# Altium PCB PCB1.PcbDoc (part 3 of 3)
Units mm, origin at the board's own origin, x right, y up, seen from the top; angles counter-clockwise.
Board outline 115 x 52 mm, 2 copper layers (Top Layer, Bottom Layer); 184 components, 116 nets, 555 pads, 115 vias.
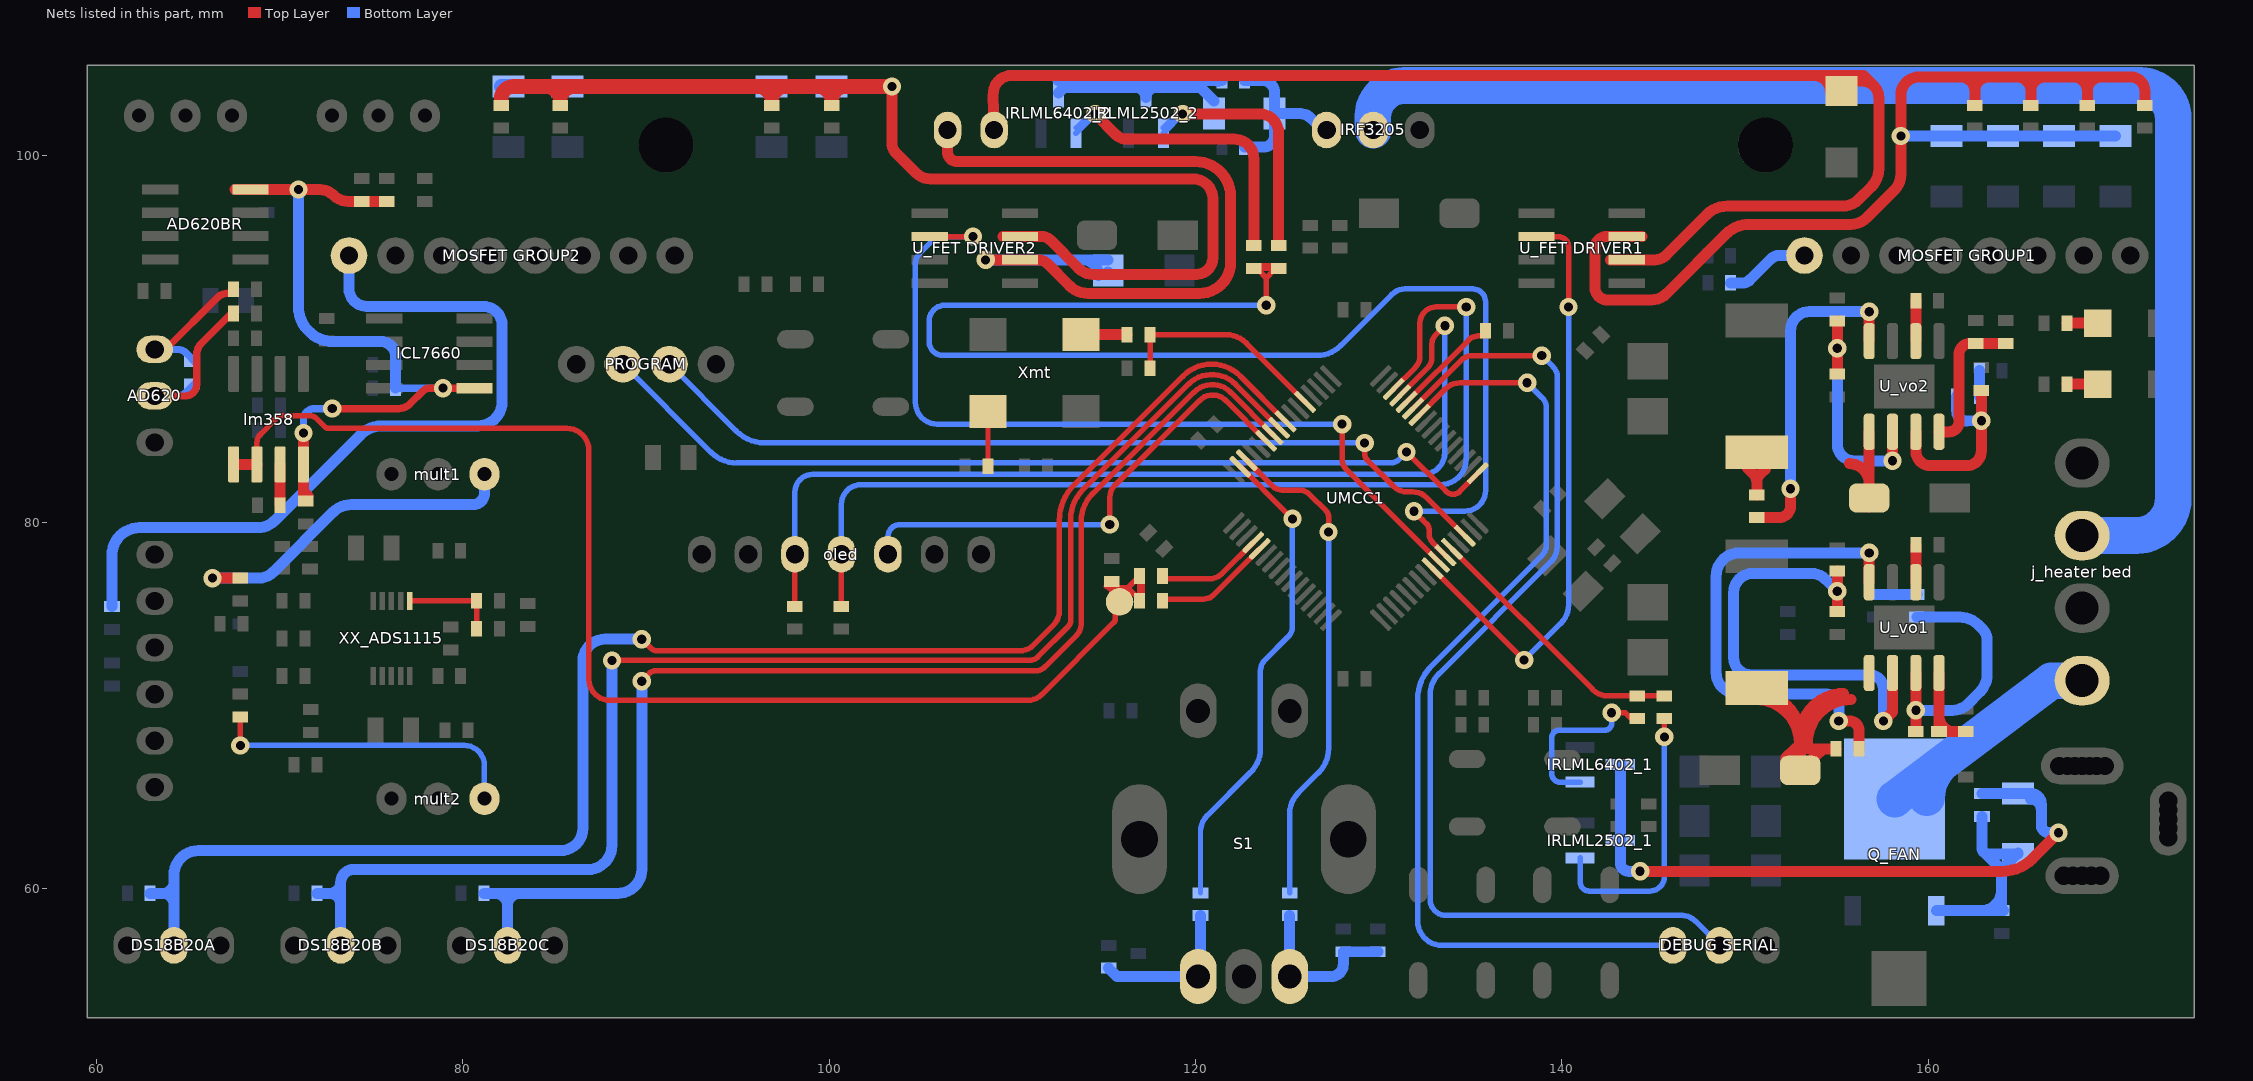
[diagram p3: the nets of this part, all layers, seen from the top]

## Via types
v1: diameter 1, hole 0.5, Top Layer to Bottom Layer, 115 vias

## Nets (pads, with @x,y where several pads share a name; then routed paths per layer and width w, separated by ;. In a path a pad name is that pad's centre, name@x,y a point inside that pad or via, vN(x,y) a via of type N, cw(c..) or ccw(c..) an arc to the next point about the centre after c; other vN are vias at no path point) (continued)
NetC_reg1_1: C_reg1.1 C_reg2.1 U_vo1.3 | length 14.5
  Top Layer w0.6: C_reg2.1@159.315,68.576 U_vo1.3@159.315,71.78
  Bottom Layer w0.6: v1(159.32,69.74) 161.323,69.74 ccw(c161.323,70.937) 162.169,70.09 ; C_reg1.1@159.37,74.828 161.721,74.828 cw(c161.721,73.425) 162.713,74.417 162.961,74.169 cw(c162.362,73.569) 163.21,73.569 163.21,71.7 cw(c161.837,71.7) 162.808,70.729 162.17,70.09
NetC_reg1_2: C_reg1.2 Rreg1.1 | length 2.3
  Bottom Layer w0.6: Rreg1.1@157.07,76.072 C_reg1.2@159.37,76.072
NetC_regl_1: C_regl.1 C_regp1.1 U_vo2.3 | length 11.3
  Top Layer w0.6: U_vo2.3@159.315,84.945 159.315,83.895 ccw(c160.11,83.895) 160.11,83.1 162.1,83.1 ccw(c162.1,83.899) 162.899,83.899 v1(162.899,85.548) C_regl.1@162.899,87.198
  Bottom Layer w0.6: C_regp1.1@161.538,86.88 161.546,86.1 ccw(c162.106,86.1) 162.119,85.54 v1(162.899,85.548)
NetC_regp1_2: C_regp1.2 Rregp5.1 | length 1.4
  Bottom Layer w0.6: C_regp1.2@162.782,86.88 Rregp5.1@162.782,88.28
NetC_reguulator1_1: C_reguulator1.1 DPND1.2 L_pp.1 U_vo1.1 | length 22.2
  Top Layer w0.6: L_pp.1@150.589,70.323 cw(c150.589,67.953) 152.959,67.953 ; L_pp.1@150.64,70.66 cw(c150.64,68.29) 153.01,68.29 ; DPND1.2@152.21,66.72 152.222,67.163 152.286,67.224 153.01,67.91 ; 153.401,67.953 cw(c155.771,67.953) 155.771,70.323 ; C_reguulator1.1@154.969,67.638 154.253,67.638 ; 155.38,70.66 ccw(c155.38,68.29) 153.01,68.29 ; 153.01,67.91 153.01,68.166 ; 153.01,67.91 DPND1.2@153.01,66.46 154.253,67.638 ; 153.01,68.166 ccw(c153.538,68.166) 153.538,67.638 154.253,67.638 ; 153.01,68.166 153.01,68.29
NetC_reguulator1_2: C_reguulator1.2 U_vo1.8 | length 26.9
  Top Layer w0.6: v1(155.113,69.153) 155.707,69.153 cw(c155.707,68.647) 156.213,68.647 C_reguulator1.2@156.213,67.638 ; U_vo1.8@156.775,76.73 v1(156.775,78.335)
  Bottom Layer w0.6: v1(155.113,69.153) 155.113,69.887 ccw(c154.36,69.887) 154.36,70.64 149.59,70.64 cw(c149.59,71.818) 148.412,71.818 148.412,77.052 cw(c149.695,77.052) 149.695,78.335 v1(156.775,78.335)
NetC_reguulatorm_1: C_reguulatorm.1 DPNDd.2 L_ppb.1 U_vo2.1 | length 8.9
  Top Layer w0.6: L_ppb.1@149.781,83.311 150.058,83.2 ccw(c150.458,83.2) 150.173,82.919 150.465,82.627 cw(c150.04,82.203) 150.64,82.203 ; C_reguulatorm.1@150.64,81.503 150.64,82.203 ; L_ppb.1@151.107,82.919 150.815,82.627 ccw(c151.24,82.203) 150.64,82.203 ; 155.69,83.2 cw(c155.69,82.115) DPNDd.2@156.775,82.115 ; DPNDd.2@156.775,80.83 DPNDd.2@156.775,82.115 ; U_vo2.1@156.775,84.945 DPNDd.2@156.775,82.115
NetC_reguulatorm_2: C_reguulatorm.2 U_vo2.8 | length 18.3
  Top Layer w0.6: C_reguulatorm.2@150.64,80.258 151.838,80.258 ccw(c151.838,80.9) 152.48,80.9 v1(152.48,81.83) ; U_vo2.8@156.775,89.895 v1(156.775,91.5)
  Bottom Layer w0.6: v1(152.48,81.83) 152.48,90.47 cw(c153.51,90.47) 153.51,91.5 v1(156.775,91.5)
NetCT1_1: CT1.1 R_PL1.2 R_PL2.1 S1.A | length 8.5
  Bottom Layer w0.6: CT1.1@115.25,55.661 115.701,55.21 R_PL1.2@116.88,55.21 S1.A@120.14,55.21 120.27,55.34 R_PL2.1@120.27,58.536
NetCT2_2: CT2.2 R_PL3.1 R_PL4.2 S1.B | length 9.2
  Bottom Layer w0.6: R_PL3.1@125.14,58.536 S1.B@125.14,55.21 127.395,55.21 ccw(c127.395,55.885) 128.07,55.885 R_PL4.2@128.07,56.56 CT2.2@129.95,56.56
NetD_GATE1_2: "U_FET DRIVER1.7" D_GATE1.2 D_GATE2.2 D_GATE3.2 D_GATE4.2 R_gate1.2 R_gate2.2 R_gate3.2 R_gate4.2 | length 65.6
  Top Layer w0.6: 144.38,95.6 143.534,95.6 142.44,95.6 ccw(c142.44,94.96) 141.8,94.96 141.8,92.83 ccw(c142.49,92.83) 142.49,92.14 144.878,92.14 ccw(c144.878,93.303) 145.701,92.481 148.95,95.73 ; 148.95,95.73 cw(c150.254,94.425) 150.254,96.27 155.79,96.27 ccw(c155.79,97.453) 156.626,96.616 158.143,98.133 ccw(c157.282,98.995) 158.5,98.995 v1(158.5,101.09) 158.5,103.32 cw(c159.49,103.32) 159.49,104.31 161.78,104.31 ; R_gate4.2@162.539,102.762 162.539,103.551 ; 163.357,104.31 164.843,104.31 ; R_gate3.2@165.602,102.762 165.602,103.551 ; 166.43,104.31 167.927,104.31 ; R_gate2.2@168.685,102.762 168.685,103.551 ; R_gate1.2@171.819,102.762 171.819,103.551 ccw(c171.06,103.551) 171.06,104.31 169.444,104.31 ; 161.78,104.31 cw(c161.78,103.551) 162.539,103.551 ; 161.78,104.31 163.297,104.31 ccw(c163.297,103.551) 162.539,103.551 ; 164.843,104.31 cw(c164.843,103.551) 165.602,103.551 ; 164.843,104.31 166.36,104.31 ccw(c166.36,103.551) 165.602,103.551 ; 167.927,104.31 cw(c167.927,103.551) 168.685,103.551 ; 167.927,104.31 169.444,104.31 ; 168.685,103.551 cw(c169.444,103.551) 169.444,104.31
  Bottom Layer w0.6: v1(158.5,101.09) D_GATE4.2@160.999,101.09 D_GATE3.2@164.072,101.09 D_GATE2.2@167.145,101.09 D_GATE1.2@170.219,101.09
NetD_GATE5_2: "U_FET DRIVER2.7" D_GATE5.2 D_GATE6.2 D_GATE7.2 D_GATE8.2 R_gate5.2 R_gate6.2 R_gate7.2 R_gate8.2 | length 94
  Top Layer w0.6: 84.282,103.79 cw(c84.282,102.762) R_gate7.2@85.31,102.762 ; 85.27,103.79 cw(c85.27,103.75) 85.31,103.75 R_gate7.2@85.31,102.762 ; 86.338,103.79 ccw(c86.338,102.762) R_gate7.2@85.31,102.762 ; 95.832,103.79 cw(c95.832,102.762) R_gate6.2@96.86,102.762 ; 96.82,103.79 cw(c96.82,103.75) 96.86,103.75 R_gate6.2@96.86,102.762 ; 97.888,103.79 ccw(c97.888,102.762) R_gate6.2@96.86,102.762 ; 99.102,103.79 cw(c99.102,102.762) R_gate5.2@100.13,102.762 ; 100.09,103.79 cw(c100.09,103.75) 100.13,103.75 R_gate5.2@100.13,102.762 ; 101.158,103.79 ccw(c101.158,102.762) R_gate5.2@100.13,102.762 ; v1(103.43,103.79) 103.43,100.684 ccw(c104.164,100.684) 103.645,100.165 104.73,99.08 ccw(c105.526,99.875) 105.526,98.75 119.87,98.75 cw(c119.87,97.68) 120.94,97.68 120.94,94.42 cw(c120.06,94.42) 120.06,93.54 114.389,93.54 cw(c114.389,94.624) 113.623,93.857 112.073,95.407 ccw(c111.607,94.941) 111.607,95.6 110.414,95.6 109.5,95.6
  Top Layer w0.8: 82.09,103.12 cw(c82.76,103.12) 82.76,103.79 84.282,103.79 85.27,103.79 86.338,103.79 95.832,103.79 96.82,103.79 97.888,103.79 99.102,103.79 100.09,103.79 101.158,103.79 v1(103.43,103.79)
  Bottom Layer w0.8: D_GATE8.2@82.09,103.79 D_GATE6.2@96.86,103.79 D_GATE5.2@100.13,103.79 v1(103.43,103.79)
NetD_GATEF_1: D_GATEF.1 Q_FAN.1 R_gateF.1 R_gateHJF.1 | length 15.4
  Bottom Layer w0.6: Q_FAN.1@160.44,58.8 162.88,58.8 ccw(c162.88,59.92) 164,59.92 ; 161.66,58.8 R_gateF.1@164.1,58.8 ; R_gateHJF.1@162.93,63.956 162.93,62.23 ccw(c163.26,62.23) 163.097,61.943 ; 163.01,62.03 163.097,61.943 ; R_gateF.1@164,58.8 164,59.92 ; D_GATEF.1@164.9,61.9 163.26,61.9 cw(c163.26,62.23) 163.097,61.943 ; D_GATEF.1@164.903,61.943 164,61.04 ; 163.097,61.943 164,61.04 ; 164,59.92 164,61.04
NetD_GATEF_2: D_GATEF.2 IRLML2502_1.3 IRLML6402_1.3 R_gateHJF.2 | length 36.8
  Top Layer w0.6: v1@144.64,60.95 164.023,60.95 ccw(c164.023,63.308) 165.691,61.641 v1(167.11,63.06)
  Bottom Layer w0.6: IRLML6402_1.3@143.19,66.77 IRLML2502_1.3@143.19,62.63 143.19,61.42 ccw(c143.66,61.42) 143.66,60.95 v1(144.27,60.95) ; R_gateHJF.2@162.93,65.2 D_GATEF.2@164.9,65.2 165.58,65.2 cw(c165.58,64.61) 166.17,64.61 166.17,63.47 ccw(c166.58,63.47) 166.58,63.06 v1(167.11,63.06) ; D_GATEF.2@165.579,64.897 cw(c165.579,64.307) 166.169,64.307
NetD_GATEH_1: D_GATEH.1 IRF3205.1 R_gateHJ.1 R_gateHP.1 | length 9.5
  Bottom Layer w0.6: R_gateHP.1@122.682,100.49 123.71,100.49 ccw(c123.71,101.09) 124.31,101.09 D_GATEH.1@124.31,102.308 ; R_gateHJ.1@122.682,104.12 123.66,104.12 cw(c123.66,103.47) 124.31,103.47 D_GATEH.1@124.31,102.308 ; IRF3205.1@127.16,101.418 126.932,101.418 126.265,102.085 ccw(c125.727,101.547) 125.727,102.308 D_GATEH.1@124.31,102.308
NetD_GATEH_2: D_GATEH.2 IRLML2502_2.3 IRLML6402_2.3 R_gateHJ.2 | length 19.8
  Bottom Layer w0.6: IRLML6402_2.3@112.5,104.12 R_gateHJ.2@121.378,104.12 ; IRLML6402_2.3@112.52,103.44 112.82,103.74 120.27,103.74 D_GATEH.2@121,103.01 ; 116.73,103.74 cw(c116.73,103.18) 117.29,103.18 cw(c117.85,103.18) 117.85,103.74 ; R_gateHJ.2@121.223,104.065 cw(c121.655,103.092) R_gateHJ.2@121.37,104.118 ; R_gateHJ.2@121.37,104.118 cw(c121.438,103.055) R_gateHJ.2@121.438,104.12 R_gateHJ.2@121.378,104.12 ; R_gateHJ.2@121.37,104.118 cw(c121.655,103.092) R_gateHJ.2@121.378,104.12
NetIRF3205_2: "j_heater bed.2" IRF3205.2 | length 73.3
  Bottom Layer w2: IRF3205.2@129.7,101.418 129.676,101.934 cw(c131.425,102.094) 131.421,103.85 171.56,103.85 cw(c171.56,102.04) 173.37,102.04 173.37,81.3 cw(c171.35,81.3) 171.35,79.28 168.4,79.28
NetIRLML2502_1_1: IRLML2502_1.1 RPL.2 | length 14.9
  Top Layer w0.3: v1(145.59,68.29) RPL.2@145.59,69.286
  Bottom Layer w0.3: IRLML2502_1.1@140.99,61.68 140.99,60.38 ccw(c141.5,60.38) 141.5,59.87 144.799,59.87 ccw(c144.799,60.661) 145.59,60.661 v1@145.59,67.95
NetIRLML2502_2_1: IRLML2502_2.1 RPS_H2.2 | length 15
  Top Layer w0.6: v1(119.294,102.294) 123.511,102.294 cw(c123.511,101.276) 124.53,101.276 RPS_H2.2@124.53,95.114
  Bottom Layer w0.3: IRLML2502_2.1@118.236,101.528 v1@119.29,102.582 ; IRLML2502_2.1@118.24,101.24 v1(119.294,102.294)
NetIRLML6402_1_1: IRLML6402_1.1 RPS.2 | length 9.6
  Top Layer w0.3: v1(142.714,69.61) 143.45,69.61 143.774,69.286 RPS.2@144.11,69.286
  Bottom Layer w0.3: IRLML6402_1.1@140.99,65.82 139.91,65.82 cw(c139.91,66.28) 139.45,66.28 139.45,68.26 cw(c139.84,68.26) 139.84,68.65 142.34,68.65 ccw(c142.34,69.024) 142.714,69.024 v1(142.714,69.61)
NetIRLML6402_2_1: IRLML6402_2.1 RPS_H1.2 | length 17.5
  Top Layer w0.6: v1(114.524,102.294) 115.664,101.155 ccw(c116.231,101.722) 116.231,100.92 122.104,100.92 cw(c122.104,99.836) 123.188,99.836 RPS_H1.2@123.188,95.114
  Bottom Layer w0.3: IRLML6402_2.1@113.47,101.24 v1(114.524,102.294) ; IRLML6402_2.1@113.499,101.528 v1@114.553,102.582
"Netj_heater bed_4": "j_heater bed.4" Q_FAN.4 | length 14.4
  Bottom Layer w2: Q_FAN.4@158.16,64.9 166.72,71.36 168.4,71.36 ; Q_FAN.4@159.916,64.974 cw(c162.456,64.974) Q_FAN.4@160.66,66.77
NetLED_1P_1: LED_1P.1 RPSn2.1 | length 1.7
  Top Layer w0.6: RPSn2.1@167.56,87.55 LED_1P.1@169.24,87.55
NetLED_2P_1: LED_2P.1 RPSn1.1 | length 1.7
  Top Layer w0.6: RPSn1.1@167.56,90.88 LED_2P.1@169.24,90.88
Netlm358_3: lm358.3 RP3.1 | length 2.2
  Top Layer w0.6: RP3.1@70.03,80.935 lm358.3@70.03,83.16
Netmult1_1: mult1.1 RTW3.1 | length 19.3
  Top Layer w0.6: v1(66.34,76.955) RTW3.1@67.86,76.955
  Bottom Layer w0.6: v1(66.34,76.955) 68.85,76.955 ccw(c68.85,78.103) 69.661,77.291 72.925,80.555 cw(c73.927,79.553) 73.927,80.97 80.56,80.97 ccw(c80.56,81.594) 81.184,81.594 mult1.1@81.184,82.63
Netmult2_1: mult2.1 RTW6.1 | length 17.3
  Top Layer w0.3: v1(67.86,67.82) RTW6.1@67.86,69.38
  Bottom Layer w0.3: v1(67.86,67.82) 80.08,67.82 cw(c80.08,66.716) 81.184,66.716 mult2.1@81.184,64.92
NetR_ADC_JUMP1_2: R_ADC_JUMP1.2 UMCC1.20 | length 5.8
  Top Layer w0.3: R_ADC_JUMP1.2@118.19,77.07 ccw(c118.34,77.07) 118.34,76.92 120.768,76.92 ccw(c120.768,77.871) 121.44,77.199 UMCC1.20@123.149,78.907
NetR_ADC_JUMP2_2: R_ADC_JUMP2.2 UMCC1.21 | length 6.5
  Top Layer w0.3: R_ADC_JUMP2.2@118.19,75.71 cw(c118.29,75.71) 118.29,75.81 120.43,75.81 ccw(c120.43,76.604) 120.991,76.042 UMCC1.21@123.502,78.553
NetR_ADDR1_2: R_ADDR1.2 R_ADDR2.2 XX_ADS1115.1 | length 5.1
  Top Layer w0.3: XX_ADS1115.1@77.104,75.711 R_ADDR1.2@80.75,75.711 R_ADDR2.2@80.75,74.28
NetR_BOOT_1: R_BOOT.1 UMCC1.60 | length 5.9
  Top Layer w0.3: UMCC1.60@131.521,86.572 134.914,89.966 cw(c135.432,89.448) 135.432,90.18 R_BOOT.1@135.95,90.18
NetR_feedaback2_1: R_feedaback2.1 R_feeedback1.2 U_vo1.4 | length 8.3
  Top Layer w0.6: R_feeedback1.2@162.04,68.576 161.409,68.576 ; 161.409,68.576 cw(c161.409,69.4) 160.585,69.4 U_vo1.4@160.585,71.78 R_feedaback2.1@160.585,68.576 161.409,68.576
NetR_feedabacko_1: R_feedabacko.1 R_feeedbackv.2 U_vo2.4 | length 8
  Top Layer w0.6: U_vo2.4@160.585,84.945 161.132,84.945 ccw(c161.132,85.492) 161.68,85.492 161.68,89.16 cw(c162.291,89.16) 162.291,89.771 R_feedabacko.1@162.599,89.771 R_feeedbackv.2@164.229,89.771
NetR_XT1_2: R_XT1.2 Xmt.1 | length 3
  Top Layer w0.3: R_XT1.2@108.67,83.06 Xmt.1@108.67,86.059
NetR_XT2_1: R_XT2.1 Xmt.3 | length 2.5
  Top Layer w0.6: Xmt.3@113.75,90.25 R_XT2.1@116.27,90.25
NetRrer1_1: Rrer1.1 U_vo1.6 | length 2
  Top Layer w0.6: U_vo1.6@159.315,76.73 Rrer1.1@159.315,78.744
NetRrer7_1: Rrer7.1 U_vo2.6 | length 2.3
  Top Layer w0.6: U_vo2.6@159.315,89.895 Rrer7.1@159.315,92.2
NetRrerp2_2: Rrerp2.2 Rrery1.2 U_vo1.2 | length 26.1
  Top Layer w0.6: Rrerp2.2@155.03,75.13 v1(155.03,76.24) Rrery1.2@155.03,77.35 ; v1(157.545,69.153) 158.045,69.653 U_vo1.2@158.045,71.78
  Bottom Layer w0.6: v1(155.03,76.24) 154.377,76.893 ccw(c153.612,76.128) 153.612,77.21 150.413,77.21 ccw(c150.413,76.17) 149.373,76.17 149.373,72.617 ccw(c150.32,72.617) 150.32,71.67 156.81,71.67 cw(c156.81,70.935) 157.545,70.935 v1(157.545,69.153)
NetRrerp6_2: Rrerp6.2 Rrery5.2 U_vo2.2 | length 13.2
  Top Layer w0.6: Rrerp6.2@155.03,88.1 v1(155.03,89.5) Rrery5.2@155.03,91 ; v1(158.045,83.36) U_vo2.2@158.045,84.945
  Bottom Layer w0.6: v1(155.03,89.5) 155.03,84.27 ccw(c155.94,84.27) 155.94,83.36 v1(158.045,83.36)
OLED_SCK: "I2C SCK.1" oled.3 UMCC1.61 | length 54.6
  Top Layer w0.3: 98.13,75.417 oled.3@98.13,78.26 ; UMCC1.61@131.167,86.925 132.656,88.414 ccw(c132.067,89.003) 132.9,89.003 132.9,89.744 cw(c133.566,89.744) 133.095,90.215 v1(133.61,90.73)
  Bottom Layer w0.3: oled.3@98.13,78.26 98.13,81.65 cw(c99.1,81.65) 99.1,82.62 132.42,82.62 ccw(c132.42,83.81) 133.61,83.81 v1(133.61,90.73)
OLED_SDA: "I2C SDA.1" oled.4 UMCC1.62 | length 56.6
  Top Layer w0.3: 100.67,75.417 oled.4@100.67,78.26 ; UMCC1.62@130.814,87.279 131.999,88.464 ccw(c131.394,89.07) 132.25,89.07 132.25,90.88 cw(c133.13,90.88) 133.13,91.76 v1(134.775,91.76)
  Bottom Layer w0.3: oled.4@100.67,78.26 100.67,80.98 cw(c101.75,80.98) 101.75,82.06 133.371,82.06 ccw(c133.371,83.464) 134.775,83.464 v1(134.775,91.76)
POWER_FAN_CTRL: RPL.1 RPS.1 UMCC1.44 | length 14.9
  Top Layer w0.3: UMCC1.44@133.996,78.553 141.685,70.864 ccw(c142.492,71.672) 142.492,70.53 RPS.1@144.11,70.53 RPL.1@145.59,70.53
POWER_HEAT_CTRL: RPS_H1.1 RPS_H2.1 UMCC1.43 | length 75.9
  Top Layer w0.3: RPS_H1.1@123.188,93.87 RPS_H2.1@124.53,93.87 ; RPS_H1.1@123.196,94.021 RPS_H2.1@124.537,94.021 ; RPS_H1.1@123.43,93.77 123.859,93.341 ; v1(123.859,91.85) 123.859,93.341 ; RPS_H2.1@124.288,93.77 123.859,93.341 ; v1@131.91,80.63 v1@131.92,80.63 ; v1(131.92,80.61) 132.397,80.133 132.611,79.919 ; 132.611,79.919 cw(c132.246,79.555) 132.762,79.555 132.762,79.341 ccw(c133.391,79.341) 132.945,78.897 ; 132.946,78.896 UMCC1.43@133.642,78.2
  Bottom Layer w0.3: v1(123.859,91.85) 106.32,91.85 ccw(c106.32,90.99) 105.46,90.99 105.46,89.864 ccw(c106.214,89.864) 106.214,89.11 126.613,89.11 ccw(c126.613,90.985) 127.939,89.659 130.723,92.443 cw(c131.445,91.72) 131.445,92.742 135.128,92.742 cw(c135.128,92.04) 135.83,92.04 135.83,81.751 cw(c134.689,81.751) 134.689,80.61 v1(131.92,80.61)
PWM_GE_CH1: "U_FET DRIVER1.2" UMCC1.41 | length 32.6
  Top Layer w0.3: UMCC1.41@132.935,77.493 v1(137.938,72.49) ; 138.606,95.6 139.8,95.6 cw(c139.8,95.04) 140.36,95.04 v1@140.36,91.46
  Bottom Layer w0.3: v1(137.938,72.49) 139.95,74.502 ccw(c138.961,75.492) 140.36,75.492 v1@140.36,91.46
  other v1: 140.36,91.76
PWM_GE_CH2: "U_FET DRIVER2.2" UMCC1.42 | length 47.5
  Top Layer w0.3: 105.486,95.6 v1(107.85,95.6) ; v1(128,85.36) 128,83.433 ccw(c128.67,83.413) 128.196,82.939 UMCC1.42@133.289,77.846
  Bottom Layer w0.3: v1(107.85,95.6) 106.147,95.6 ccw(c106.147,94.875) 105.635,95.388 104.957,94.71 ccw(c105.553,94.114) 104.71,94.114 104.71,91.977 104.71,86.55 ccw(c105.9,86.55) 105.9,85.36 v1(128,85.36)
RES_OLED: oled.5 UMCC1.11 | length 26.9
  Top Layer w0.3: v1(115.32,79.88) 115.32,81.37 cw(c116.237,81.37) 115.589,82.019 120.221,86.651 cw(c120.939,85.933) 121.694,86.612 UMCC1.11@123.856,84.451
  Bottom Layer w0.3: oled.5@103.21,78.26 103.21,79.22 cw(c103.87,79.22) 103.87,79.88 v1(115.32,79.88)
rotary_left: R_PL2.2 UMCC1.15 | length 26.3
  Top Layer w0.3: UMCC1.15@122.442,83.036 124.855,80.623 v1(125.289,80.189)
  Bottom Layer w0.3: R_PL2.2@120.27,59.78 120.27,63.12 cw(c121.477,63.12) 120.624,63.974 123.009,66.359 ccw(c121.727,67.641) 123.54,67.641 123.54,71.876 cw(c124.418,71.876) 123.797,72.497 125.06,73.76 ccw(c124.507,74.313) 125.289,74.313 v1(125.289,80.189)
rotary_right: R_PL3.2 UMCC1.14 | length 27
  Top Layer w0.3: UMCC1.14@122.795,83.39 124.21,81.976 ccw(c124.73,82.496) 124.73,81.76 125.651,81.76 cw(c125.651,80.941) 126.23,81.52 127.143,80.607 cw(c126.86,80.324) 127.26,80.324 v1(127.26,79.473)
  Bottom Layer w0.3: R_PL3.2@125.14,59.78 125.14,64.11 cw(c126.709,64.11) 125.6,65.22 126.723,66.343 ccw(c125.425,67.64) 127.26,67.64 v1(127.26,79.473)
S_SIG+: AD620.2 C_SMP.1 R_DIFF1.1 | length 9.9
  Top Layer w0.4: AD620.2@63.179,86.9 64.85,86.9 ccw(c64.85,87.52) 65.47,87.52 65.47,89.131 cw(c66.409,89.131) 65.745,89.795 R_DIFF1.1@67.453,91.503
  Bottom Layer w0.4: AD620.2@63.179,86.9 64.419,86.9 ccw(c64.419,87.579) 64.899,87.098 ; 64.899,87.099 C_SMP.1@65.428,87.628
S_SIG-: AD620.3 C_SMP.2 R_DIFF2.1 | length 8.1
  Top Layer w0.4: AD620.3@63.179,89.44 63.77,89.44 66.65,92.32 ; 66.652,92.317 cw(c67.177,91.684) 67.177,92.506 R_DIFF2.1@67.517,92.506
  Bottom Layer w0.4: AD620.3@63.179,89.44 64.419,89.44 cw(c64.419,88.761) 64.899,89.241 C_SMP.2@65.428,88.712
SENSOR_TEMP1: DS18B20A.2 PWL1.2 UMCC1.8 | length 89.8
  Top Layer w0.3: v1(89.77,73.62) 90.236,73.154 ccw(c90.632,73.55) 90.632,72.99 110.409,72.99 ccw(c110.409,74.031) 111.145,73.295 112.243,74.393 ccw(c111.478,75.158) 112.56,75.158 112.56,80.101 cw(c115.295,80.099) 113.419,82.089 119.315,87.985 cw(c120.879,86.432) 122.44,87.988 UMCC1.8@124.916,85.512
  Bottom Layer w0.6: PWL1.2@62.935,59.746 63.631,59.746 ; DS18B20A.2@64.231,56.906 64.231,59.146 ; v1(89.77,73.62) 87.76,73.62 ccw(c87.76,72.41) 86.55,72.41 86.55,63.29 cw(c85.34,63.29) 85.339,62.08 65.56,62.08 ccw(c65.56,60.751) 64.231,60.751 64.231,60.346 ; 63.631,59.746 ccw(c63.631,60.346) 64.231,60.346 ; 63.631,59.746 cw(c63.631,59.146) 64.231,59.146 ; 64.231,59.146 64.231,60.346
SENSOR_TEMP2: DS18B20B.2 PWL2.2 UMCC1.9 | length 81.5
  Top Layer w0.3: v1(88.14,72.46) 110.93,72.46 ccw(c110.93,73.089) 111.374,72.644 113.05,74.32 ccw(c112.736,74.634) 113.18,74.634 113.18,80.157 cw(c115.485,80.155) 113.855,81.785 119.61,87.54 cw(c120.895,86.254) 122.188,87.533 UMCC1.9@124.563,85.158
  Bottom Layer w0.6: PWL2.2@72.04,59.746 72.736,59.746 ; DS18B20B.2@73.336,56.906 73.336,59.146 ; 73.336,58.026 73.336,59.146 ; 73.336,59.846 73.336,59.146 ; 73.336,60.266 73.336,59.146 ; v1(88.14,72.46) 88.14,62.36 cw(c86.826,62.36) 86.826,61.046 74.036,61.046 ccw(c74.036,60.346) 73.336,60.346 cw(c72.736,60.346) 72.736,59.746 ; 72.736,59.746 cw(c72.736,59.146) 73.336,59.146
SENSOR_TEMP3: DS18B20C.2 PWL3.2 UMCC1.10 | length 70.5
  Top Layer w0.3: v1(89.77,71.33) 90.217,71.777 cw(c90.514,71.479) 90.514,71.9 111.273,71.9 ccw(c111.273,72.617) 111.78,72.11 113.52,73.85 ccw(c112.965,74.405) 113.75,74.405 113.75,80.03 cw(c115.943,80.032) 114.394,81.584 119.925,87.115 cw(c120.912,86.129) 121.905,87.108 UMCC1.10@124.209,84.804
  Bottom Layer w0.6: PWL3.2@81.145,59.746 82.441,59.746 ; 81.792,59.738 cw(c81.792,59.09) 82.44,59.09 cw(c83.088,59.09) 83.088,59.738 ; DS18B20C.2@82.441,56.906 82.441,59.746 ; v1(89.77,71.33) 89.77,61.053 cw(c88.462,61.053) 88.462,59.746 83.088,59.746 82.441,59.746
SIGNAL_ADC_SHUNT_RES: C_LOm.1 lm358.1 lm358.2 pad.@115.85,75.66 R_ADC_JUMP1.1 R_ADC_JUMP2.1 | length 74.3
  Top Layer w0.3: lm358.2@68.76,83.16 68.76,84.353 cw(c69.393,84.353) 68.946,84.801 69.809,85.664 ; 69.809,85.664 cw(c70.186,85.286) 70.186,85.82 71.619,85.82 cw(c71.619,85.237) 72.031,85.649 72.439,85.241 ccw(c72.707,85.508) 72.707,85.13 85.675,85.13 cw(c85.675,83.922) 86.884,83.922 86.884,71.436 ccw(c88.04,71.436) 88.04,70.28 110.849,70.28 ccw(c110.849,71.321) 111.585,70.585 115.552,74.552 ccw(c115.412,74.692) 115.61,74.692 pad.@115.61,75.81 ; C_LOm.1@115.134,76.525 cw(c114.69,75.714) pad.@115.61,75.81 ; C_LOm.1@115.61,76.92 115.61,76.423 ; R_ADC_JUMP2.1@116.946,75.71 R_ADC_JUMP1.1@116.946,77.07 116.299,76.423 ; R_ADC_JUMP2.1@116.946,75.776 116.299,76.423 ; R_ADC_JUMP2.1@117.1,75.61 R_ADC_JUMP1.1@117.1,76.97 ; pad.@115.61,75.81 115.61,76.423 ; 115.61,76.423 116.299,76.423
  Top Layer w0.6: lm358.1@67.49,83.16 lm358.2@68.76,83.16
SOURCE_FED1: "U_FET DRIVER1.6" C_BACK1.2 SOURCE_FEEDBACK.2 | length 75.5
  Top Layer w0.6: SOURCE_FEEDBACK.2@109,101.418 108.954,103.339 cw(c109.965,103.387) 109.965,104.4 156.46,104.4 157,103.86 ; 142.64,94.33 143.534,94.33 145.077,94.33 ccw(c145.077,95.183) 145.68,94.58 147.89,96.79 cw(c149.025,95.654) 149.025,97.26 155.324,97.26 ccw(c155.324,98.481) 156.188,97.618 156.915,98.345 ; 153.767,104.393 cw(c153.767,103.493) C_BACK1.2@154.667,103.493 ; C_BACK1.2@155.25,104.08 156.4,104.08 cw(c156.4,103.18) 157.3,103.18 157.3,99.274 cw(c155.986,99.274) 156.916,98.346
SOURCE_FED2: "U_FET DRIVER2.6" C_BACK2.2 SOURCE_FEEDBACK.1 | length 44.7
  Top Layer w0.6: SOURCE_FEEDBACK.1@106.46,101.418 106.46,100.23 ccw(c107,100.23) 107,99.69 120.01,99.69 cw(c120.01,97.78) 121.92,97.78 121.92,94.21 cw(c120.21,94.21) 120.21,92.5 114.119,92.5 cw(c114.119,93.897) 113.131,92.909 111.945,94.095 ccw(c111.378,93.528) 111.378,94.33 110.414,94.33 v1(108.54,94.33)
  Bottom Layer w0.6: v1(108.54,94.33) 113.85,94.33 ; C_BACK2.2@114.7,93.48 ccw(c113.85,93.48) 113.85,94.33 ; C_BACK2.2@115.2,93.65 C_BACK2.2@115.23,93.68 ; C_BACK2.2@115.216,94.33 113.85,94.33
TCK(SWCLK): PROGRAM.3 UMCC1.49 | length 50.4
  Top Layer w0.3: v1(131.52,83.843) 133.659,81.704 ccw(c134.08,82.125) 134.08,81.53 ccw(c134.08,81.958) 134.382,81.655 UMCC1.49@135.41,82.683
  Bottom Layer w0.3: PROGRAM.3@88.74,88.635 93.551,83.824 ccw(c94.961,85.234) 94.961,83.24 95.3,83.24 129.414,83.24 130.674,83.24 ccw(c130.674,83.824) 131.088,83.411 v1(131.52,83.843)
TCK(SWIO): PROGRAM.2 UMCC1.46 | length 47.6
  Top Layer w0.3: v1(129.23,84.333) 129.23,83.731 ccw(c129.692,83.731) 129.365,83.405 130.798,81.972 ccw(c131.526,82.699) 131.526,81.67 131.838,81.67 cw(c131.838,80.571) 132.615,81.348 UMCC1.46@134.703,79.26
  Bottom Layer w0.3: PROGRAM.2@91.28,88.635 94.922,84.993 ccw(c96.511,86.579) 96.495,84.333 v1(129.23,84.333)
UART_RX: "DEBUG SERIAL.2" UMCC1.59 | length 57.9
  Top Layer w0.3: UMCC1.59@131.874,86.218 134.492,88.836 cw(c135.13,88.197) 135.13,89.1 v1(138.9,89.1)
  Bottom Layer w0.3: v1(138.9,89.1) 139.528,88.472 cw(c139.016,87.96) 139.74,87.96 139.74,78.65 cw(c138.629,78.65) 139.415,77.865 133.277,71.727 ccw(c134.429,70.575) 132.8,70.575 132.8,59.435 ccw(c133.695,59.435) 133.695,58.54 146.56,58.54 cw(c146.56,57.561) 147.253,58.253 148.6,56.906
UART_TX: "DEBUG SERIAL.3" UMCC1.58 | length 53.8
  Top Layer w0.3: UMCC1.58@132.228,85.865 133.657,87.293 cw(c134.445,86.505) 134.445,87.62 v1(138.1,87.62)
  Bottom Layer w0.3: v1(138.1,87.62) 138.925,86.795 cw(c138.382,86.252) 139.15,86.252 139.15,78.79 cw(c138.281,78.79) 138.895,78.175 132.868,72.148 ccw(c134.664,70.352) 132.124,70.352 132.124,58.235 ccw(c133.454,58.235) 133.454,56.906 146.06,56.906
V-: AD620BR.4 C_ICL2.1 C_ICL3.1 C_ICL4.2 C_LO5.1 C_LOB.1 ICL7660.5 lm358.4 RP2.2 | length 42.4
  Top Layer w0.4: v1(72.87,86.21) 76.506,86.21 ccw(c76.506,87.064) 77.109,86.459 ; 77.11,86.46 77.813,87.163 cw(c78.204,86.771) 78.204,87.325 v1(78.92,87.325) ICL7660.5@80.644,87.325
  Top Layer w0.6: AD620BR.4@67.57,98.165 AD620BR.4@68.414,98.165 v1(71.03,98.165) 72.2,98.165 cw(c72.2,97.115) 72.943,97.857 ccw(c73.76,98.674) 73.76,97.519 RP2.2@74.479,97.519 C_ICL4.2@75.86,97.519 ; C_LOB.1@71.3,81.376 71.3,81.687 ; v1(71.3,84.88) lm358.4@71.3,83.16 71.3,82.268 71.3,81.687 ; C_LOB.1@71.557,81.43 71.3,81.687
  Bottom Layer w0.4: v1(71.3,84.88) 71.3,85.61 cw(c71.9,85.61) 71.9,86.21 v1(72.87,86.21) ; C_ICL2.1@76.329,87.325 v1(78.92,87.325)
  Bottom Layer w0.6: C_LO5.1@69.295,98.165 v1(71.03,98.165) 71.03,91.781 ccw(c72.941,91.781) 72.941,89.87 75.52,89.87 cw(c75.52,89.061) 76.329,89.061 C_ICL3.1@76.329,88.595 C_ICL2.1@76.329,87.325
"VOLTAGE _READ1": "MOSFET GROUP1.8" VOLTAGE_DEVIDE1.1 | length 4.6
  Bottom Layer w0.6: VOLTAGE_DEVIDE1.1@149.214,93.07 149.851,93.07 ccw(c149.851,93.67) 150.275,93.245 151.419,94.389 cw(c151.842,93.964) 151.84,94.564 151.842,94.564 153.239,94.564
"VOLTAGE _READ2": "MOSFET GROUP2.8" VOLTAGE_DEVIDE3.1 | length 43.4
  Bottom Layer w0.6: VOLTAGE_DEVIDE3.1@60.85,75.4 60.85,78.21 cw(c62.35,78.21) 62.35,79.71 68.817,79.71 ccw(c68.817,80.973) 69.71,80.08 74.405,84.775 cw(c75.6,83.58) 75.6,85.27 80.82,85.27 ccw(c80.82,86.6) 82.15,86.6 82.15,90.75 ccw(c81.11,90.75) 81.11,91.79 74.757,91.79 cw(c74.757,92.758) 73.789,92.758 73.789,94.564
XT_CLOCK: CLxt.1 R_XT2.2 UMCC1.5 | length 11.8
  Top Layer w0.3: CLxt.1@117.514,88.414 R_XT2.2@117.514,90.25 121.65,90.25 ; 121.651,90.25 cw(c121.65,88.683) 122.756,89.793 cw(c121.65,88.683) 122.758,89.791 UMCC1.5@125.976,86.573
pads on no net: "MOSFET GROUP1.5" "MOSFET GROUP1.7" "MOSFET GROUP2.7" "U_FET DRIVER1.5" "U_FET DRIVER2.5" ICL7660.1 ICL7660.6 ICL7660.7 UMCC1.4 UMCC1.6 UMCC1.16 UMCC1.17 UMCC1.22 UMCC1.23 UMCC1.26 UMCC1.27 UMCC1.28 UMCC1.33 UMCC1.34 UMCC1.35 UMCC1.36 UMCC1.40 UMCC1.45 UMCC1.50 UMCC1.53 UMCC1.54 UMCC1.55 UMCC1.56 UMCC1.57

## Polygon pours and split planes (outlines as drawn)
ADGND on Bottom Layer "ADGND_L02_P007" (solid, remove dead copper, pour order 7): 59.51,62.93 83.044,62.93 cw(c83.044,62.886) 83.075,62.917 83.075,84.639 83.071,84.643 75.161,84.643 ccw(c75.161,82.103) 73.365,83.899 70.84,81.374 cw(c69.044,83.17) 69.044,80.63 59.508,80.63
ADGND on Bottom Layer "ADGND_L02_P005" (solid, pour order 5): 59.51,62.93 83.044,62.93 cw(c83.044,62.886) 83.075,62.917 83.075,84.639 83.071,84.643 75.161,84.643 ccw(c75.161,82.103) 73.365,83.899 70.84,81.374 cw(c69.044,83.17) 69.044,80.63 59.508,80.63
A_GND_ANALOG on Bottom Layer "A_GND_ANALOG_L02_P014" (solid, remove dead copper, pour order 14): 83.057,104.925 59.49,104.95 59.49,81.599 70.504,81.599 73.644,84.868 83.057,84.868
GND on Bottom Layer "GND_L02_P000" (solid, remove dead copper, pour order 0): 174.511,104.954 174.512,104.953 174.512,52.95 174.508,52.954 59.513,52.954 59.513,62.6 59.507,62.606 83.59,62.606 83.595,62.601 83.595,104.953
GND on Top Layer "GND_L01_P002" (solid, remove dead copper, pour order 2): 174.503,104.962 174.504,104.961 174.504,52.958 174.5,52.962 59.505,52.962 59.505,62.608 59.499,62.614 83.582,62.614 83.587,62.609 83.587,104.961

## Other copper
Top Layer:
  region net SIGNAL_ADC_SHUNT_RES: 116.937,75.28 116.937,76.849 115.471,76.849 115.471,75.28
  rectangle net SIGNAL_ADC_SHUNT_RES: 116.42,75.28 116.93,76.747
  region net GND: 117.014,60.283 119.248,58.049 120.06,58.86 117.826,61.094
  region net GND: 128.992,60.589 128.992,57.43 130.14,57.43 130.14,60.589
  region net GND: 130.919,63.958 120.499,63.958 120.499,60.183 130.919,60.183
  region net GND: 118.583,56.854 118.583,67.274 114.809,67.274 114.809,56.854
  rectangle net GND: 120.58,60.427 131,66.6
  region net GND: 138.619,67.638 138.237,68.02 137.329,67.112 137.711,66.73
  rectangle net GND: 138.237,66.361 140.029,68.02
  region net GND: 126.087,70.21 121.64,70.21 121.64,68.291 126.087,68.291
  region net GND: 139.88,75.11 141.235,76.465 140.785,76.915 139.43,75.56
  rectangle net GND: 142.653,71.181 147.1,73.1
  rectangle net GND: 134.123,65.307 135.83,68.05
  rectangle net GND: 137.7,65.471 139.359,67.39
  region net GND: 137.87,67.111 137.33,67.111 137.33,65.41 137.87,65.41
  rectangle net GND: 137.33,60.863 137.87,66.21
  rectangle net MCU_Reset: 105.16,86.12 105.59,86.5
  rectangle net GND: 109.326,83.13 109.93,84.659
  rectangle net GND: 130.092,92.16 134,92.91
  rectangle net GND: 155.663,73.059 160.593,75.541
  rectangle net GND: 155.955,86.212 160.885,88.694
  rectangle net +3.3V: 82.64,62.21 83.39,62.82
  rectangle net GND: 129.61,53.13 130.28,53.74
  rectangle net SIGNAL_ADC_SHUNT_RES: 115.321,76.423 115.61,76.92
  region net MCU_GND: 118.191,79.861 118.191,80.181 117.831,80.181 117.831,79.861
  rectangle net MCU_GND: 119.11,79.2 119.585,79.595
  rectangle net POWER_HEAT_CTRL: 123.566,93.46 124.174,93.87
  region net MCU_+3.3: 128.13,75.399 128.597,75.867 128.36,76.104 127.892,75.636
  region net +3.3V: 144.884,76.047 144.884,78.067 143.584,78.067 143.584,76.047
  rectangle net +3.3V: 143.137,77.922 145.157,79.222
  region net MCU_+3.3: 135.66,79.6 138.637,82.577 138.022,83.192 135.045,80.215
  region net MCU_+3.3: 141.661,81.136 140.252,81.136 140.252,80.736 141.661,80.736
  region net MCU_+3.3: 138.546,82.443 140.252,80.736 140.535,81.019 138.829,82.725
  region net MCU_+3.3: 137.699,83.511 140.005,81.205 140.46,81.66 138.154,83.966
  region net MCU_+3.3: 139.214,82.577 137.806,82.577 137.806,81.968 139.214,81.968
  rectangle net MCU_+3.3: 137.35,82.11 138.792,82.788
  rectangle net MCU_+3.3: 137.35,82.64 138.19,83.57
  rectangle net MCU_+3.3: 137.39,82.788 138.23,83.49
  rectangle net +3.3V: 144.086,76.34 145.83,78.256
  rectangle net +3.3V: 150.13,76.94 151.09,78.23
  rectangle net MCU_GND: 117.85,79.84 118.17,80.2
  rectangle net GND: 139.33,66.93 140.06,67.79
  rectangle net KEY_READ2: 135.43,68.49 137.03,70.85
  rectangle net KEY_READ3: 137.63,68.53 138.76,70.85
  rectangle net GND: 171.079,92.04 172.26,92.798
  rectangle net GND: 169.88,92.59 173,93.19
  region net GND: 173.945,92.665 173.04,93.57 171.39,91.92 172.295,91.015
  rectangle net GND: 171.39,62.4 174.08,91.92
  rectangle net MCU_GND: 129.07,86.15 129.5,86.47
  region net GND: 172.795,86.015 173.566,86.786 172.761,87.591 171.99,86.82
  rectangle net GND: 171.99,86.82 173.08,91.92
  rectangle net GND: 160,74.255 160.703,75.44
  rectangle net GND: 139.48,67.13 139.88,67.78
  rectangle net MCU_+3.3: 128.44,89.08 128.879,89.32
  region net +3.3V: 145.783,76.559 147.077,77.853 145.38,79.55 144.086,78.256
  rectangle net NetC_reguulator1_1: 152.42,69.59 153.7,70.87
  rectangle net NetC_reguulator1_1: 153.126,66.54 154.11,67.551
  rectangle net NetC_reguulator1_1: 148.93,70.03 157.075,72.765
  rectangle net NetC_reguulatorm_1: 150.465,82.627 150.805,83.363
  rectangle net NetC_reguulator1_1: 152.65,69.21 153.37,70.36
  rectangle net NetC_reguulatorm_1: 148.93,82.9 156.775,85.93
Bottom Layer:
  rectangle net GND: 130.982,98.249 147.71,98.85
  rectangle net +12V: 147.05,68.23 148.56,69.88
  rectangle net ADGND: 59.56,69.34 59.942,76.82
  region net A_GND_ANALOG: 70.915,82.275 70.546,82.644 69.091,81.189 69.46,80.82
  rectangle net A_GND_ANALOG: 59.503,80.82 69.46,81.94
  region net A_GND_ANALOG: 63.279,82.174 62.91,81.805 64.39,80.325 64.759,80.694
  region net A_GND_ANALOG: 64.39,81.027 64.39,80.325 65.935,80.325 65.935,81.027
  region net A_GND_ANALOG: 63.62,81.822 63.62,81.17 66.33,81.17 66.33,81.822
  region net A_GND_ANALOG: 64.22,81.87 64.22,80.51 66.12,80.51 66.12,81.87
  region net A_GND_ANALOG: 67.39,81.78 67.021,82.149 65.566,80.694 65.935,80.325
  region net GND: 128.313,66.493 127.944,66.862 126.871,65.789 127.24,65.42
  rectangle net GND: 127.55,62.14 129.97,66.4
  rectangle net GND: 128.995,57.367 131.415,61.627
  region net GND: 129.493,58.354 130.91,59.771 128.651,62.031 127.234,60.614
  rectangle net GND: 126.867,59.66 130.55,65.8
  rectangle net GND: 113.5,58.74 118.57,66.64
  rectangle net NetIRLML2502_2_1: 118.31,101.67 118.867,102.04
  rectangle net NetIRLML6402_2_1: 113.72,101.69 114.13,102.04
  rectangle net NetD_GATEH_2: 120.58,101.43 121.74,103.94
  rectangle net NetD_GATEH_2: 112.2,102.64 112.82,104.12
  rectangle net +12V: 147.141,68.7 148.121,70.122
  rectangle net +12V: 146.74,67.49 147.72,70.04
  rectangle net NetD_GATEF_2: 165.28,64.6 165.963,64.864
  rectangle net NetD_GATEF_1: 163.64,61.1 164.31,61.83
  rectangle net +12V: 170.497,62.271 171.298,63.488
  rectangle net +12V: 170.849,60.91 171.79,66.46
  rectangle net +12V: 169.509,62.82 171.65,66.117
  rectangle net +12V: 168.46,63.734 171.65,66.79
  pour cut-out: 156.98,76.437 156.98,75.28 152.94,75.28 152.94,76.452

## Silkscreen, mask and mechanical layers (free items; w line width, h text height)
Top Overlay:
  circle w0.1: c151.101,100.594 r2.8
  circle w0.1: c91.101,100.594 r2.8
  lines w0.1: 114.35,69.46 114.35,69.5 ; 59.511,52.954 174.511,52.954 174.511,104.954 59.511,104.954 59.511,52.954 ; 87.67,53.56 113.67,53.56 113.67,79.56 87.67,79.56 87.67,53.56
  lines w0.5: 59.73,80.09 66.5,80.09 67.36,79.23 71.96,79.23 72.53,79.8 72.53,84.46 73.6,85.53 84.18,85.53 ; 59.74,61.99 84.18,61.99 ; 71.06,97.05 71.06,93.33 71.98,92.41 83.37,92.41 84.18,91.6 84.18,85.53 ; 87.03,53.18 87.03,59.14 84.18,61.99 ; 114.27,53.24 114.27,70.47 116.29,72.49 140,72.49 141.96,70.53 141.96,63.43 142.689,62.701 152.759,62.701 153.22,62.24 153.22,53.17 ; 143.61,53.15 143.61,62.66 ; 84.18,61.99 84.18,85.53
  text "Source SMP" at 105.06,98.021 h1.5 r90
  text "GATE DRIVING/ADC" at 155.26,96.36 h1.5
  text "GATE DRIVING/ADC" at 79.459,96.276 h1.5
  text "GAIN" at 62.4,95.43 h1 r90
  text "OFFSET" at 72.581,95.43 h1 r90
  text "User LED" at 174.18,92.61 h1 r90
  text "PROG" at 87.771,91.51 h1.5
  text "STM32F103RET6" at 130.893,89.457 h1 r315
  text "RESET MCU" at 98.421,82.1 h1.5
  text "AD620 AMP" at 59.69,81.5 h1
  text "MP1584EN" at 146.65,78.25 h1 r90
  text "PWM OUT" at 162.6,73.65 h1 r90
  text "ADS1115" at 59.81,62.77 h1
  text "USER KEY" at 132.85,62.735 h1.5 r90
  text "OLED_0.96_128x64" at 87.547,62.325 h2 r90
  text "TX/RX DBG" at 144.654,60.578 h1.5
  text "3CH DS18B20 Tempreture" at 61.02,59.72 h2

## Text inside footprints (layer, text, board x,y; h text height)
"AD GAIN": Top Overlay "CW" at 62.244,100.981 h1 r180
"AD OFFSET": Top Overlay "CW" at 72.774,100.981 h1 r180
"Elko E_1": Top Overlay "Elko E" at 156.549,54.849 h3 r90
mult1: Top Overlay "CW" at 76.028,81.411 h1 r180
mult2: Top Overlay "CW" at 76.028,63.701 h1 r180
Xmt: Top Overlay "4" at 109.97,89.359 h0.9; Top Overlay "3" at 111.97,89.359 h0.9; Top Overlay "1" at 109.813,86.923 h0.9; Top Overlay "2" at 111.87,86.959 h0.9